# Altium PCB board.PcbDoc
Units mm, origin at the board's own origin, x right, y up, seen from the top; angles counter-clockwise.
Board outline 39.75 x 48.5 mm, 2 copper layers (Top Layer, Bottom Layer), stack 0.97 mm thick; 115 components, 19 nets, 316 pads, 8 vias.
Unrouted connection lines stored in the file: 1.
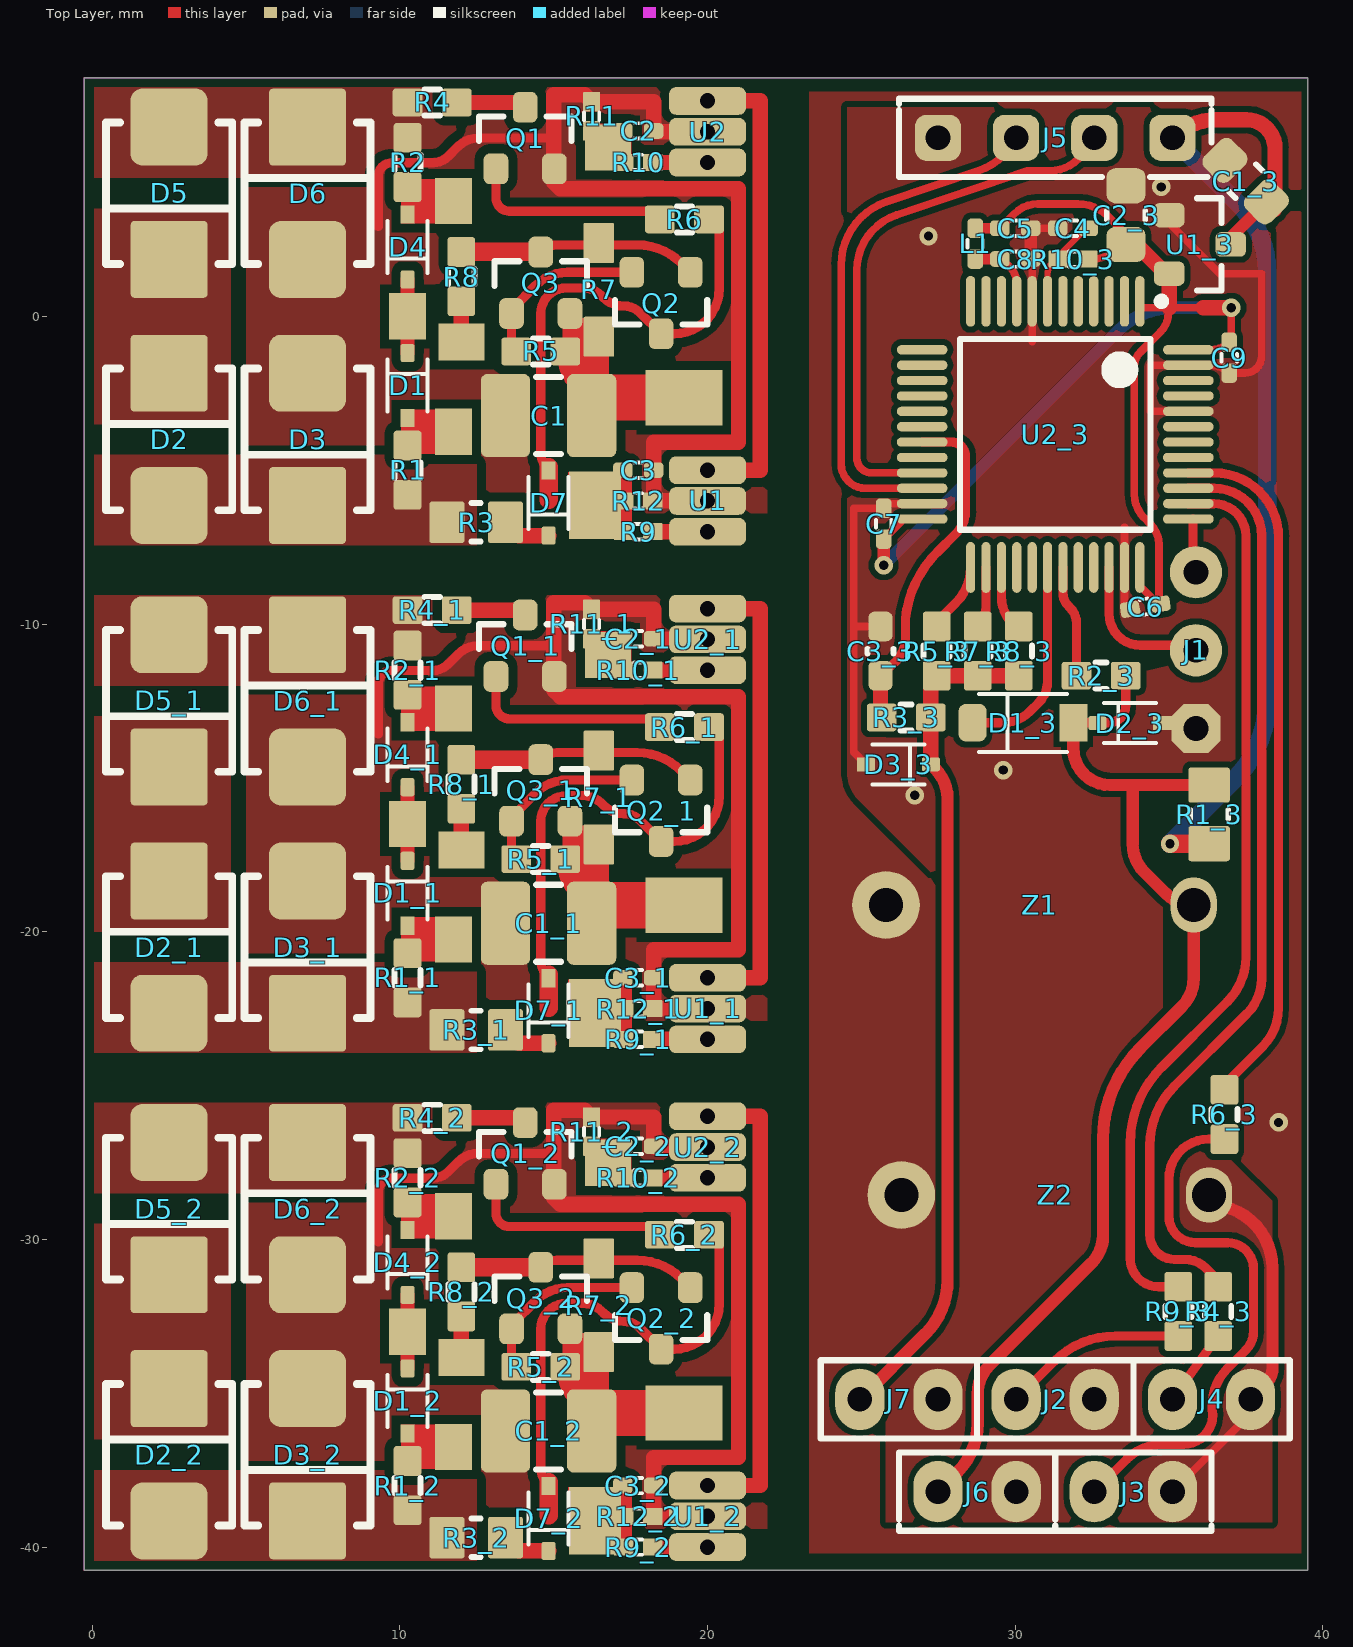
[diagram p0: Top Layer view]
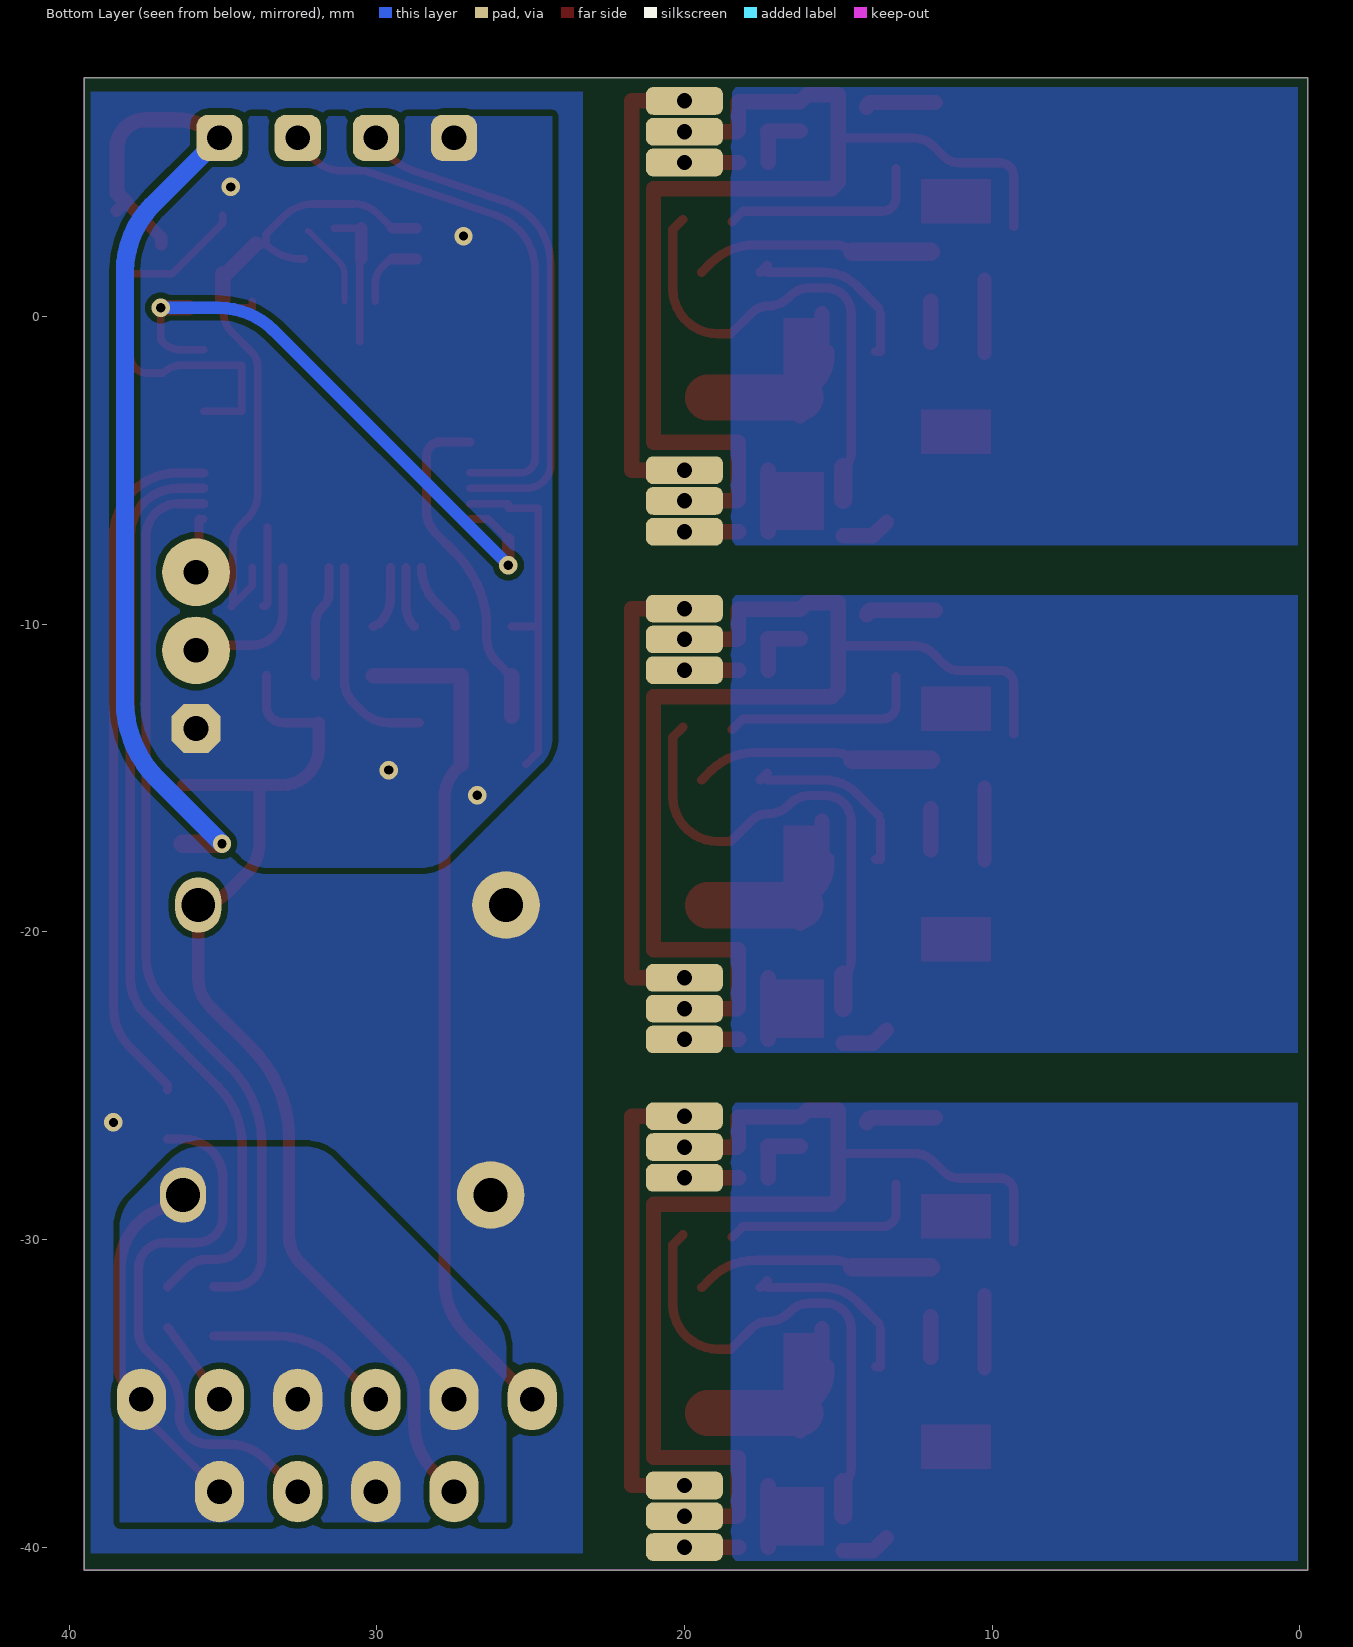
[diagram p1: Bottom Layer view, seen from below]
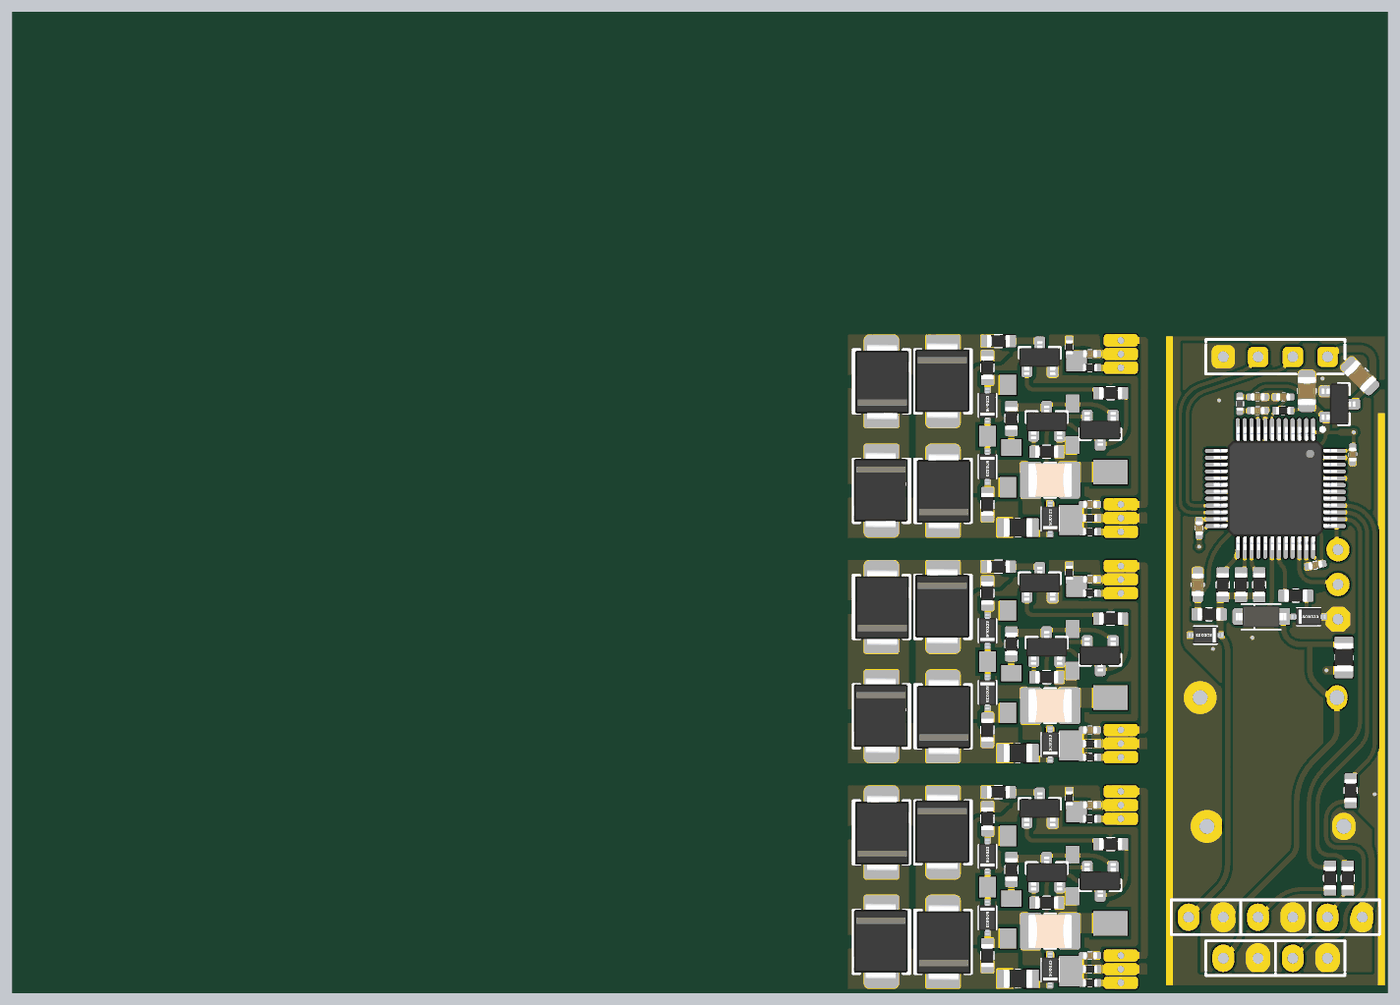
[diagram p2: 3D render of the assembled board from above, using the file's embedded part models]

## Layer stack, top to bottom
Top Solder: solder mask 0.0127, Solder Resist, Dk 3.8
Top Layer: signal copper 0.035
Dielectric: core 0.9, FR-4, Dk 4.5
Bottom Layer: signal copper 0.035
Bottom Solder: solder mask 0.0127, Solder Resist, Dk 3.8

## Board outline
-0.25,-40.75 39.5,-40.75 39.5,7.75 -0.25,7.75

## Design rules (kind name [scope] priority, off if disabled: settings)
AcuteAngle [All] p1: minimum=6.00000000000000E+0001 checktracksonly=FALSE
BoardOutlineClearance [All] p1: gap=0 ignorepadtopadclearanceinfootprint=FALSE
Clearance Clearance_1 [All] p1: gap=0.3 ignorepadtopadclearanceinfootprint=FALSE except(0.1: Arc-THPad Track-THPad SMDPad-THPad THPad-THPad; 0.13: Arc-Arc Arc-Track Arc-SMDPad Arc-Via Track-Track Track-SMDPad Track-Via SMDPad-SMDPad SMDPad-Via THPad-Via Via-Via; 0.15: Arc-Text Arc-Hole Track-Text Track-Hole SMDPad-Text SMDPad-Hole THPad-Text THPad-Hole Via-Text Via-Hole Fill-Text Fill-Hole Poly-Text Poly-Hole Region-Text Region-Hole Text-Text Text-Hole)
ComponentClearance ComponentClearance_1 [IsFree] p1: gap=-1 collisioncheckmode=3 verticalgap=2540 showdistances=FALSE
ComponentClearance [All] p2: gap=0.3 collisioncheckmode=3 verticalgap=0.254 showdistances=FALSE donotcheckwithout3dbody=TRUE
Height [All] p1: minheight=0 maxheight=500 prefheight=12.7
HoleSize [All] p1: absolutevalues=TRUE maxlimit=6 minlimit=0.2 maxpercent=80.000 minpercent=20.000
HoleToHoleClearance HoleToHoleClearance_1 [IsVia vs IsThruPin] p1: gap=0.7 allowstackedmicrovias=TRUE
HoleToHoleClearance [All] p2: gap=0.5 allowstackedmicrovias=TRUE
MinimumSolderMaskSliver [All] p1 off: minsoldermaskwidth=0.254
PlaneClearance [All] p1: clearance=0.45
PlaneConnect [All] p1: planeconnectstyle=Direct reliefexpansion=0.3 reliefentries=4 reliefconductorwidth=0.381 reliefairgap=0.178
PolygonConnect [All] p1: connectstyle=Direct reliefconductorwidth=0.381 reliefentries=4 polygonreliefangle="90 Angle" airgapwidth=0.356
RoutingVias [All] p1: holewidth=0.3 width=0.6 viastyle="Through Hole" minholewidth=0.2 minwidth=0.45 maxholewidth=0.9 maxwidth=1.27
SilkToSilkClearance [All] p1 off: silktosilkclearance=0.254
SilkToSolderMaskClearance [IsPad] p1 off: minsilkscreentomaskgap=0.254 clearancetoexposedcopper=TRUE
SolderMaskExpansion [All] p1: expansion=0.102 istentingtop=FALSE
SupplyNets "Schematic Supply Nets_7" [InNet('L1')] p1: voltage=0.000
SupplyNets "Schematic Supply Nets_6" [InNet('L2')] p2: voltage=0.000
SupplyNets "Schematic Supply Nets_5" [InNet('3V3')] p3: voltage=0.000
SupplyNets "Schematic Supply Nets_3" [InNet('Vb')] p4: voltage=0.000
SupplyNets "Schematic Supply Nets" [InNet('5V')] p5: voltage=0.000
SupplyNets "Schematic Supply Nets_1" [InNet('GND')] p6: voltage=0.000
UnRoutedNet [All] p1: checkbadconnections=TRUE
Width [All] p1: maxlimit=3.81 minlimit=0.14 preferedwidth=0.254
20 further rules are at their usual default settings.

## Classes and differential pairs
component class board: C1 C2 C3 D1 D2 D3 D4 D5 D6 D7 Q1 Q2 Q3 R1 R2 R3 R4 R5 R6 R7 R8 R9 R10 R11 R12 U1 U2

## Components (designator, comment, footprint, x,y, rotation, side; value= is the part's Value field where it differs from the comment)
C1 "10u" C1210-2.5MM 14.834,-3.226 r180 top
C1_1 "10u" C1210-2.5MM 14.834,-19.726 r180 top (schematic designator C1)
C1_2 "10u" C1210-2.5MM 14.834,-36.226 r180 top (schematic designator C1)
C1_3 "10uF" C0805 37.491,4.395 r315 top (schematic designator C1)
C2 "100pF" C0402 17.75,6.024 r0 top
C2_1 "100pF" C0402 17.75,-10.476 r0 top (schematic designator C2)
C2_2 "100pF" C0402 17.75,-26.976 r0 top (schematic designator C2)
C2_3 "10uF" C0805 33.6,3.29 r270 top (schematic designator C2)
C3 "100pF" C0402 17.75,-5 r0 top
C3_1 "100pF" C0402 17.75,-21.5 r0 top (schematic designator C3)
C3_2 "100pF" C0402 17.75,-38 r0 top (schematic designator C3)
C3_3 "100pF" C0603 25.619,-10.878 r270 top (schematic designator C3)
C4 "100nF" C0402 31.877,2.862 r0 top
C5 "100nF" C0402 30,2.862 r180 top
C6 "100nF" C0402 34.226,-9.438 r10 top
C7 "100nF" C0402 25.725,-6.738 r270 top
C8 "100nF" C0402 30,1.862 r180 top
C9 "100nF" C0402 36.952,-1.344 r90 top
D1 "1N4148WS" SOD-323 10.25,-2.25 r270 top
D1_1 "1N4148WS" SOD-323 10.25,-18.75 r270 top (schematic designator D1)
D1_2 "1N4148WS" SOD-323 10.25,-35.25 r270 top (schematic designator D1)
D1_3 "1N4148WS" SOD-123 30.252,-13.206 r0 top (schematic designator D1)
D2 "ES2B" SMB 2.5,-4 r90 top
D2_1 "ES2B" SMB 2.5,-20.5 r90 top (schematic designator D2)
D2_2 "ES2B" SMB 2.5,-37 r90 top (schematic designator D2)
D2_3 "5V" SOD-323 33.726,-13.219 r0 top (schematic designator D2)
D3 "ES2B" SMB 7,-4 r270 top
D3_1 "ES2B" SMB 7,-20.5 r270 top (schematic designator D3)
D3_2 "ES2B" SMB 7,-37 r270 top (schematic designator D3)
D3_3 "5V" SOD-323 26.203,-14.561 r180 top (schematic designator D3)
D4 "1N4148WS" SOD-323 10.25,2.25 r90 top
D4_1 "1N4148WS" SOD-323 10.25,-14.25 r90 top (schematic designator D4)
D4_2 "1N4148WS" SOD-323 10.25,-30.75 r90 top (schematic designator D4)
D5 "ES2B" SMB 2.5,4 r270 top
D5_1 "ES2B" SMB 2.5,-12.5 r270 top (schematic designator D5)
D5_2 "ES2B" SMB 2.5,-29 r270 top (schematic designator D5)
D6 "ES2B" SMB 7,4 r90 top
D6_1 "ES2B" SMB 7,-12.5 r90 top (schematic designator D6)
D6_2 "ES2B" SMB 7,-29 r90 top (schematic designator D6)
D7 "BAS321" SOD-323 14.834,-6.071 r90 top
D7_1 "BAS321" SOD-323 14.834,-22.571 r90 top (schematic designator D7)
D7_2 "BAS321" SOD-323 14.834,-39.071 r90 top (schematic designator D7)
J1 "SWD" SWD 35.874,-10.857 r0 top
J2 "Header 2" HDR-1X2 31.3,-35.2 r90 top
J3 "Header 2" HDR-1X2 33.84,-38.2 r90 top
J4 "Header 2" HDR-1X2 36.38,-35.2 r90 top
J5 "Header 4" HDR-1X4 31.3,5.8 r270 top
J6 "Header 2" HDR-1X2 28.76,-38.2 r90 top
J7 "Header 2" HDR-1X2 26.22,-35.2 r90 top
L1 "BEAD" L0402 28.7,2.362 r270 top
Q1 "MMBT2222" SOT-23 14.073,5.793 r270 top
Q1_1 "MMBT2222" SOT-23 14.073,-10.707 r270 top (schematic designator Q1)
Q1_2 "MMBT2222" SOT-23 14.073,-27.207 r270 top (schematic designator Q1)
Q2 "Bipolar PNP 3 Pins Transistor Gummel-Poon Model" SOT-23 18.491,0.432 r90 top
Q2_1 "Bipolar PNP 3 Pins Transistor Gummel-Poon Model" SOT-23 18.491,-16.068 r90 top (schematic designator Q2)
Q2_2 "Bipolar PNP 3 Pins Transistor Gummel-Poon Model" SOT-23 18.491,-32.568 r90 top (schematic designator Q2)
Q3 "Bipolar PNP 3 Pins Transistor Gummel-Poon Model" SOT-23 14.58,1.092 r270 top
Q3_1 "Bipolar PNP 3 Pins Transistor Gummel-Poon Model" SOT-23 14.58,-15.408 r270 top (schematic designator Q3)
Q3_2 "Bipolar PNP 3 Pins Transistor Gummel-Poon Model" SOT-23 14.58,-31.908 r270 top (schematic designator Q3)
R1 "20k" R0603 10.25,-5 r270 top
R1_1 "20k" R0603 10.25,-21.5 r270 top (schematic designator R1)
R1_2 "20k" R0603 10.25,-38 r270 top (schematic designator R1)
R1_3 "2k2" R0805 36.3,-16.187 r270 top (schematic designator R1)
R2 "20k" R0603 10.25,5 r90 top
R2_1 "20k" R0603 10.25,-11.5 r90 top (schematic designator R2)
R2_2 "20k" R0603 10.25,-28 r90 top (schematic designator R2)
R2_3 "10k" R0603 32.788,-11.678 r0 top (schematic designator R2)
R3 "22" R0805 12.481,-6.694 r0 top
R3_1 "22" R0805 12.481,-23.194 r0 top (schematic designator R3)
R3_2 "22" R0805 12.481,-39.694 r0 top (schematic designator R3)
R3_3 "4k7" R0603 26.458,-13.037 r0 top (schematic designator R3)
R4 "1" R0603 11.05,6.95 r0 top
R4_1 "1" R0603 11.05,-9.55 r0 top (schematic designator R4)
R4_2 "1" R0603 11.05,-26.05 r0 top (schematic designator R4)
R4_3 "470" R0603 36.597,-32.341 r270 top (schematic designator R4)
R5 "33" R0603 14.58,-1.143 r180 top
R5_1 "33" R0603 14.58,-17.643 r180 top (schematic designator R5)
R5_2 "33" R0603 14.58,-34.143 r180 top (schematic designator R5)
R5_3 "10k" R0603 27.448,-10.878 r270 top (schematic designator R5)
R6 "4k7" R0603 19.25,3.15 r180 top
R6_1 "4k7" R0603 19.25,-13.35 r180 top (schematic designator R6)
R6_2 "4k7" R0603 19.25,-29.85 r180 top (schematic designator R6)
R6_3 "470" R0603 36.8,-25.941 r270 top (schematic designator R6)
R7 "10k" R1206 16.468,0.86 r270 top
R7_1 "10k" R1206 16.468,-15.64 r270 top (schematic designator R7)
R7_2 "10k" R1206 16.468,-32.14 r270 top (schematic designator R7)
R7_3 "20k" R0603 28.782,-10.878 r270 top (schematic designator R7)
R8 "4k7" R0603 12,1.292 r270 top
R8_1 "4k7" R0603 12,-15.208 r270 top (schematic designator R8)
R8_2 "4k7" R0603 12,-31.708 r270 top (schematic designator R8)
R8_3 "30k" R0603 30.115,-10.878 r270 top (schematic designator R8)
R9 "1k" R0402 17.75,-7 r180 top
R9_1 "1k" R0402 17.75,-23.5 r180 top (schematic designator R9)
R9_2 "1k" R0402 17.75,-40 r180 top (schematic designator R9)
R9_3 "470" R0603 35.3,-32.341 r270 top (schematic designator R9)
R10 "1k" R0402 17.75,5 r180 top
R10_1 "1k" R0402 17.75,-11.5 r180 top (schematic designator R10)
R10_2 "1k" R0402 17.75,-28 r180 top (schematic designator R10)
R10_3 "4k7" R0402 31.877,1.862 r180 top (schematic designator R10)
R11 "2k" R0402 16.23,6.5 r270 top
R11_1 "2k" R0402 16.23,-10 r270 top (schematic designator R11)
R11_2 "2k" R0402 16.23,-26.5 r270 top (schematic designator R11)
R12 "2k" R0402 17.75,-6 r180 top
R12_1 "2k" R0402 17.75,-22.5 r180 top (schematic designator R12)
R12_2 "2k" R0402 17.75,-39 r180 top (schematic designator R12)
U1 "SS49E" SS49E 20,-6 r0 top
U1_1 "SS49E" SS49E 20,-22.5 r0 top (schematic designator U1)
U1_2 "SS49E" SS49E 20,-39 r0 top (schematic designator U1)
U1_3 "XC6206P332MR" SOT-23 36.004,2.337 r180 top (schematic designator U1)
U2 "SS49E" SS49E 20,6 r0 top
U2_1 "SS49E" SS49E 20,-10.5 r0 top (schematic designator U2)
U2_2 "SS49E" SS49E 20,-27 r0 top (schematic designator U2)
U2_3 "STM32F103CBT6" LQFP-48 31.3,-3.838 r270 top (schematic designator U2)
Z1 "Z" Z90 30.8,-19.133 r90 top
Z2 "Z" Z90 31.3,-28.557 r90 top locked

## Footprints (in the part's own frame and the unit in brackets; to place one, negate y for a bottom-side part, rotate by r counter-clockwise, add the part's x,y. Pads: shape width x height; smd on the part's side, far side on the other; paste and mask are expansions set on the pad)
C0402 [mm] "Chip Capacitor Body"
  rrect50% 0.635x0.508 smd mask+0.05: 1(-0.5,0) 2(0.5,0)
  silkscreen extent -0.13,-0.25 0.13,0.25, body extent -0.52,-0.27 0.53,0.28, height 0.55
C0603 [mil] "Chip Capacitor"
  rrect50% 38x31 smd mask+1.97: 1(-31.5,0) 2(31.5,0)
  silkscreen extent -3,-17 3,17, body extent -33,-18 33,18, height 35
C0805 [mil] "Chip Capacitor"
  rrect50% 45x50 smd mask+1.97: 1(-37.5,0) 2(37.5,0)
  silkscreen extent -6,-25 6,25, body extent -41,-27 41,27, height 53
C1210-2.5MM [mm] "Chip Capacitor"
  rrect25% 1.6x2.7 smd mask+0.05: 1(-1.4,0) 2(1.4,0)
  silkscreen extent -0.4,-1.25 0.4,1.25, body extent -1.6,-1.25 1.6,1.25, height 2.52
HDR-1X2 [mm]
  oval 2x1.6 hole 0.8: 1(0,1.27) 2(0,-1.27)
  silkscreen extent -1.27,-2.54 1.27,2.54
HDR-1X4 [mm]
  rrect50% 1.5x1.5 hole 0.8: 1(0,3.81) 2(0,1.27) 3(0,-1.27) 4(0,-3.81)
  silkscreen extent -1.27,-5.08 1.27,5.08
L0402 [mm] "Chip Inductor"
  rrect50% 0.635x0.508 smd mask+0.05: 1(-0.5,0) 2(0.5,0)
  silkscreen extent -0.13,-0.25 0.13,0.25, body extent -0.5,-0.25 0.5,0.25, height 0.5
LQFP-48 [mm]
  oval 1.65x0.3 smd: 1(-4.325,2.75) 2(-4.325,2.25) 3(-4.325,1.75) 4(-4.325,1.25) 5(-4.325,0.75) 6(-4.325,0.25) 7(-4.325,-0.25) 8(-4.325,-0.75) 9(-4.325,-1.25) 10(-4.325,-1.75) 11(-4.325,-2.25) 12(-4.325,-2.75) 25(4.325,-2.75) 26(4.325,-2.25) 27(4.325,-1.75) 28(4.325,-1.25) 29(4.325,-0.75) 30(4.325,-0.25) 31(4.325,0.25) 32(4.325,0.75) 33(4.325,1.25) 34(4.325,1.75) 35(4.325,2.25) 36(4.325,2.75)
  oval 0.3x1.65 smd: 13(-2.75,-4.325) 14(-2.25,-4.325) 15(-1.75,-4.325) 16(-1.25,-4.325) 17(-0.75,-4.325) 18(-0.25,-4.325) 19(0.25,-4.325) 20(0.75,-4.325) 21(1.25,-4.325) 22(1.75,-4.325) 23(2.25,-4.325) 24(2.75,-4.325) 37(2.75,4.325) 38(2.25,4.325) 39(1.75,4.325) 40(1.25,4.325) 41(0.75,4.325) 42(0.25,4.325) 43(-0.25,4.325) 44(-0.75,4.325) 45(-1.25,4.325) 46(-1.75,4.325) 47(-2.25,4.325) 48(-2.75,4.325)
  silkscreen extent -4.45,-3.1 3.1,3.58, body extent -4.5,-4.5 4.5,4.5, height 1.5
R0402 [mm]
  rrect10% 0.635x0.55 smd mask+0.05: 1(-0.476,0) 2(0.476,0)
  silkscreen extent -0.12,-0.25 0.13,0.25, body extent -0.52,-0.27 0.53,0.28, height 0.4
R0603 [mil] "Chip Resistor; Body 1.6 x 0.8 mm (LxW typ)"
  rrect20% 38x35.43 smd mask+1.97: 1(-31.5,0) 2(31.5,0)
  silkscreen extent -10,-17 10,17, body extent -33,-18 33,18, height 22
R0805 [mil] "Chip Resistor; Body 1.6 x 0.8 mm (LxW typ)"
  rrect15% 45x53.15 smd: 1(-37.5,0) 2(37.5,0)
  silkscreen extent -6,-25 6,25, body extent -41,-27 41,27, height 24
R1206 [mm] "Chip Resistor"
  rrect10% 1.3x1 smd mask+0.05: 1(-1.524,0) 2(1.524,0)
SMB [mm]
  rrect30% 2.5x2.5 smd mask+0.05: 1(-2.15,0)
  rrect10% 2.5x2.5 smd mask+0.05: 2(2.15,0)
  silkscreen extent -2.3,-2.05 2.3,2.05, body extent -2.75,-1.93 2.85,2.02, height 2.65
SOD-123 [mm]
  rect 0.91x1.22 smd mask+0.05: 1(1.635,0)
  rrect50% 0.91x1.22 smd mask+0.05: 2(-1.635,0)
  silkscreen extent -1.43,-0.95 1.43,0.92, body extent -1.85,-0.77 1.85,0.77, height 1.44
SOD-323 [mm]
  rect 0.59x0.45 smd mask+0.05: 1(1.055,0)
  rrect30% 0.59x0.45 smd mask+0.05: 2(-1.055,0)
  silkscreen extent -0.85,-0.65 0.85,0.65, body extent -1.25,-0.63 1.25,0.62, height 0.99
SOT-23 [mm]
  rrect50% 1x0.8 smd mask+0.05: 1(1,-0.95) 2(1,0.95) 3(-1,0)
  silkscreen extent -0.7,-1.5 0.1,1.5, body extent -1.27,-1.5 1.33,1.5, height 1.1
SS49E [mm]
  rrect50% 2.5x0.9 hole 0.5: 1(0,1) 2(0,0) 3(0,-1)
SWD [mm]
  round 1.7 / inner round 1.7 / far side round 2.2 hole 0.8: 1(0,2.54) 2(0,0)
  oct 1.6x1.6 hole 0.8: 3(0,-2.54)
Z90 [mm]
  round 2.2 hole 1.1: 1(0,5)
  oval 1.8x1.5 hole 1.1: 2(0,-5)
  body extent -4.5,-3 4.5,3, height 9.5

## Part data
C1 C1_1 C1_2 C2 C2_1 C2_2 C3 C3_1 C3_2: library part CAP
C1_3 C2_3 C3_3: library part CAP, "10uf 50V 1206"
C4 C5 C6 C7 C8 C9: library part CAP, "100nF 50V 0402"
D1 D1_1 D1_2 D2 D2_1 D2_2 D3 D3_1 D3_2 D4 D4_1 D4_2 D5 D5_1 D5_2 D6 D6_1 D6_2 D7 D7_1 D7_2: library part NCP51460SN33T1G
D1_3: library part NCP51460SN33T1G, LCSC part number=C693617, P/N=SMCJ24A
D2_3 D3_3: library part NCP51460SN33T1G, "SD05", LCSC part number=C693617, P/N=SMCJ24A
J1: library part "Header 3"
L1: library part BLM18AG601SN1D, "BEAD 0402"
Q1 Q1_1 Q1_2: library part MMBT2222ALT1G
Q2 Q2_1 Q2_2 Q3 Q3_1 Q3_2: library part "BJT PNP GP"
R1 R1_1 R1_2 R1_3 R2 R2_1 R2_2 R2_3 R3 R3_1 R3_2 R3_3 R4 R4_1 R4_2 R4_3 R5 R5_1 R5_2 R5_3 R6 R6_1 R6_2 R6_3 R7 R7_1 R7_2 R7_3 R8 R8_1 R8_2 R8_3 R9 R9_1 R9_2 R9_3 R10 R10_1 R10_2 R11 R11_1 R11_2 R12 R12_1 R12_2: library part RES
R10_3: library part RES, "4k7 0402"
U1_3: library part Component_4_1

## Free pads (board coordinates)
  rect 1.2x1.5 smd: 3.3(10.25,-33) 3.3(10.25,-16.5) 3.3(10.25,0) DCC1(11.75,-36.75) DCC1(11.75,-20.25) DCC1(11.75,-3.75) DCC2(11.75,-29.25) DCC2(11.75,-12.75) DCC2(11.75,3.75)
  rect 2.5x1.8 smd: 5(19.231,-35.642) 5(19.231,-19.142) 5(19.231,-2.642)
  rect 1.5x1.2 smd: +(12,-33.838) +(12,-17.338) +(12,-0.838)
  rect 1.7x2.2 smd: H1(16.341,-39.142) H1(16.341,-22.642) H1(16.341,-6.142)
  rect 1.5x1.5 smd: H2(16.764,-27.511) H2(16.764,-11.011) H2(16.764,5.489)

## Via types
v1: diameter 0.6, hole 0.3, Top Layer to Bottom Layer, tented both sides, 8 vias

## Nets (pads, with @x,y where several pads share a name; then routed paths per layer and width w, separated by ;. In a path a pad name is that pad's centre, name@x,y a point inside that pad or via, vN(x,y) a via of type N, cw(c..) or ccw(c..) an arc to the next point about the centre after c; other vN are vias at no path point)
3V3: D1.2 D4.2 pad.3.3@10.25,0 | length 2.4
  Top Layer w0.45: D1.2 10.25,0 D4.2
5V: C1.1 pad.5@19.231,-2.642 Q3.2 R5.1 R7.2 U1.1 U2.1 | length 22.2
  Top Layer w0.5: Q3.2 15.53,-0.774 15.53,-1.143 R5.1 15.38,-1.359 ccw(c16.483,-1.359) 15.703,-2.139 C1.1@16.234,-2.67 ; C1.1 C1.1@16.234,-2.642 ; U1.1 21.717,-5 21.717,7 U2.1
  Top Layer w1.5: C1.1@16.234,-2.642 pad.5@19.231,-2.642
DCC1: D1.1 pad.DCC1@11.75,-3.75 R1.1
DCC2: D4.1 pad.DCC2@11.75,3.75 R2.1
GND: C1.2 C2.2 C3.2 D3.1 D6.1 Q1.2 R11.1 R12.1 U1.2 U2.2 | length 37.4
  Top Layer w0.3: 9.296,2.921 9.296,4.547 cw(c9.74,4.547) 9.74,4.99 11.078,4.99 ccw(c11.078,5.684) 11.569,5.193 11.902,5.527 cw(c12.546,4.882) 12.546,5.793 15.037,5.793
  Top Layer w0.5: R12.1@18.25,-5.976 C3.2 18.25,-4.089 21.006,-4.089 21.006,4.14 15.215,4.14 14.996,4.359 14.996,4.793 14.996,5.793 14.996,7.196 16.01,7.196 R11.1 18.25,6.976 C2.2 ; R12.1@18.283,-6 U1.2 ; C2.2@18.283,6 U2.2
HALL1: C3.1 pad.H1@16.341,-6.142 R9.2 R12.2 | length 2
  Top Layer w0.5: R9.2 R12.2 C3.1@17.274,-5
HALL2: C2.1 pad.H2@16.764,5.489 R10.2 R11.2 | length 2.1
  Top Layer w0.5: R11.2 pad.H2@17.298,6.024 ; R10.2 pad.H2@17.274,6
L1: D2.1 D3.2 R1.2 R3.1
L2: D5.1 D6.2 R2.2 R4.1
NetD7_1: D7.1 Q2.3 R6.1 | length 16.2
  Top Layer w0.3: D7.1 cw(c15.447,-4.402) 14.58,-4.402 14.58,0.087 cw(c15.415,0.087) 15.415,0.922 15.948,0.922 cw(c15.948,0.07) 16.55,0.672 16.609,0.614 ccw(c17.286,1.29) 17.286,0.333 cw(c17.286,-0.4) 17.805,0.118 Q2.3 18.908,-0.568 ccw(c18.908,0.904) 20.38,0.904 20.38,2.819 R6.1
  Top Layer w0.6: 14.834,-5.969 D7.1@14.834,-4.9
NetD7_2: D7.2 R3.2 | length 1.6
  Top Layer w0.5: R3.2 13.865,-7.126 D7.2
NetQ1_1: Q1.1 R6.2 | length 6.7
  Top Layer w0.3: Q1.1 13.123,3.857 ccw(c13.566,3.857) 13.566,3.414 18.109,3.414 R6.2@18.45,3.073
NetQ1_3: Q1.3 R4.2 | length 2.3
  Top Layer w0.5: R4.2 13.917,6.95 cw(c13.917,6.793) Q1.3
NetQ2_1: Q2.1 Q3.3 R7.1 R8.1 | length 7.8
  Top Layer w0.3: Q3.3@14.545,2.092 cw(c15.097,1.54) 15.097,2.321 17.717,2.321 cw(c17.717,0.305) 19.143,1.73 Q2.1
  Top Layer w0.6: R8.1 Q3.3@14.545,2.092
NetQ2_2: Q2.2 Q3.1 R5.2 | length 5.8
  Top Layer w0.3: Q3.1 13.63,-1.143 R5.2 ; Q3.1@13.68,0.27 14.409,0.999 cw(c15.454,-0.046) 15.454,1.432 ; 15.438,1.432 Q2.2@17.313,1.432 ; Q2.2@17.313,1.66 Q2.2
NetR9_1: R9.1 U1.3 | length 1.8
  Top Layer w0.5: R9.1 U1.3
NetR10_1: R10.1 U2.3 | length 1.8
  Top Layer w0.5: R10.1 U2.3
UART_OD: pad.+@12,-0.838 R8.2 | length 1.3
  Top Layer w0.5: pad.+@12,-0.838 R8.2
Vb: D2.2 D5.2
pads on no net: C1_1.1 C1_1.2 C1_2.1 C1_2.2 C1_3.1 C1_3.2 C2_1.1 C2_1.2 C2_2.1 C2_2.2 C2_3.1 C2_3.2 C3_1.1 C3_1.2 C3_2.1 C3_2.2 C3_3.1 C3_3.2 C4.1 C4.2 C5.1 C5.2 C6.1 C6.2 C7.1 C7.2 C8.1 C8.2 C9.1 C9.2 D1_1.1 D1_1.2 D1_2.1 D1_2.2 D1_3.1 D1_3.2 D2_1.1 D2_1.2 D2_2.1 D2_2.2 D2_3.1 D2_3.2 D3_1.1 D3_1.2 D3_2.1 D3_2.2 D3_3.1 D3_3.2 D4_1.1 D4_1.2 D4_2.1 D4_2.2 D5_1.1 D5_1.2 D5_2.1 D5_2.2 D6_1.1 D6_1.2 D6_2.1 D6_2.2 D7_1.1 D7_1.2 D7_2.1 D7_2.2 J1.1 J1.2 J1.3 J2.1 J2.2 J3.1 J3.2 J4.1 J4.2 J5.1 J5.2 J5.3 J5.4 J6.1 J6.2 J7.1 J7.2 L1.1 L1.2 Q1_1.1 Q1_1.2 Q1_1.3 Q1_2.1 Q1_2.2 Q1_2.3 Q2_1.1 Q2_1.2 Q2_1.3 Q2_2.1 Q2_2.2 Q2_2.3 Q3_1.1 Q3_1.2 Q3_1.3 Q3_2.1 Q3_2.2 Q3_2.3 R1_1.1 R1_1.2 R1_2.1 R1_2.2 R1_3.1 R1_3.2 R2_1.1 R2_1.2 R2_2.1 R2_2.2 R2_3.1 R2_3.2 R3_1.1 R3_1.2 R3_2.1 R3_2.2 R3_3.1 R3_3.2 R4_1.1 R4_1.2 R4_2.1 R4_2.2 R4_3.1 R4_3.2 R5_1.1 R5_1.2 R5_2.1 R5_2.2 R5_3.1 R5_3.2 R6_1.1 R6_1.2 R6_2.1 R6_2.2 R6_3.1 R6_3.2 R7_1.1 R7_1.2 R7_2.1 R7_2.2 R7_3.1 R7_3.2 R8_1.1 R8_1.2 R8_2.1 R8_2.2 R8_3.1 R8_3.2 R9_1.1 R9_1.2 R9_2.1 R9_2.2 R9_3.1 R9_3.2 R10_1.1 R10_1.2 R10_2.1 R10_2.2 R10_3.1 R10_3.2 R11_1.1 R11_1.2 R11_2.1 R11_2.2 R12_1.1 R12_1.2 R12_2.1 R12_2.2 U1_1.1 U1_1.2 U1_1.3 U1_2.1 U1_2.2 U1_2.3 U1_3.1 U1_3.2 U1_3.3 U2_1.1 U2_1.2 U2_1.3 U2_2.1 U2_2.2 U2_2.3 U2_3.1 U2_3.2 U2_3.3 U2_3.4 U2_3.5 U2_3.6 U2_3.7 U2_3.8 U2_3.9 U2_3.10 U2_3.11 U2_3.12 U2_3.13 U2_3.14 U2_3.15 U2_3.16 U2_3.17 U2_3.18 U2_3.19 U2_3.20 U2_3.21 U2_3.22 U2_3.23 U2_3.24 U2_3.25 U2_3.26 U2_3.27 U2_3.28 U2_3.29 U2_3.30 U2_3.31 U2_3.32 U2_3.33 U2_3.34 U2_3.35 U2_3.36 U2_3.37 U2_3.38 U2_3.39 U2_3.40 U2_3.41 U2_3.42 U2_3.43 U2_3.44 U2_3.45 U2_3.46 U2_3.47 U2_3.48 Z1.1 Z1.2 Z2.1 Z2.2
copper on no net: | length 593.7
  Top Layer w0.2: 31.05,0.487 31.05,1.369 cw(c31.6,1.369) 31.211,1.757 32.232,2.777
  Top Layer w0.25: 25.148,-14.561 24.748,-14.161 24.748,-10.078 ; 25.619,-10.078 24.748,-10.078 ; 25.725,-7.238 26.375,-6.588 26.975,-6.588 ; 25.725,-6.088 25.725,-6.138 ; 25.846,-6.088 ccw(c25.846,-6.259) 25.725,-6.138 ; 25.875,-6.088 26.975,-6.088 ; 26.975,-5.588 25.129,-5.588 cw(c25.129,-4.802) 24.344,-4.802 24.344,1.67 cw(c26.509,1.67) 25.817,3.722 28.807,4.731 ccw(c28.128,6.742) 30.03,5.8 ; 26.975,-5.088 25.335,-5.088 cw(c25.335,-4.606) 24.853,-4.606 24.853,1.501 cw(c26.742,1.501) 26.138,3.291 30.402,4.73 31.127,4.73 ccw(c31.127,6.025) 32.043,5.109 32.409,5.476 ; 29.5,1.862 29.566,1.862 29.825,1.602 cw(c29.282,1.059) 30.05,1.059 30.05,0.487 ; 29.5,2.862 29.972,3.334 cw(c30.743,2.563) 30.743,3.653 32.03,3.653 cw(c32.03,2.238) 33.031,3.239 33.6,2.669 33.6,2.337 ; 30.5,1.862 30.55,1.862 30.55,0.487 30.55,-0.822 ; 30.5,2.862 31.377,2.862 ; 32.353,1.862 32.453,1.862 ccw(c32.453,3.484) 33.6,2.337 ; 33.55,-9.292 ccw(c33.721,-9.292) 33.6,-9.413 33.7,-9.413 ; 33.55,-9.263 33.55,-6.854 ; 34.05,-8.163 34.05,-8.763 34.7,-9.413 ; 34.05,0.487 34.05,0.275 34.978,0.275 ; 34.054,2.337 33.934,2.337 33.6,2.337 ; 34.726,-9.438 cw(c34.859,-9.306) 34.671,-9.306 34.671,-7.417 ccw(c33.735,-7.417) 34.397,-6.756 34.19,-6.549 cw(c34.964,-5.776) 33.87,-5.776 33.87,-1.624 cw(c34.504,-1.624) 34.056,-1.175 34.712,-0.519 ccw(c34.068,0.124) 34.978,0.124 34.978,0.275 ; 35.004,3.287 35.004,3.028 36.645,1.387 38.011,1.387 38.011,-1.295 cw(c37.461,-1.295) 37.461,-1.844 36.952,-1.844 ccw(c36.333,-2.463) 36.333,-1.588 35.625,-1.588 34.389,-1.588 34.389,-3.088 35.625,-3.088 ; 35.11,-38.2 37.325,-35.985 ccw(c36.539,-35.2) 37.65,-35.2 ; 35.625,-6.588 35.78,-6.588 ; 35.625,-1.088 36.363,-1.088 ccw(c36.363,-0.256) 36.952,-0.844 ccw(c36.782,-0.674) 37.022,-0.674 v1(37.022,0.275) ; 36.116,0.275 35.004,0.275 34.978,0.275 ; 24.748,-10.078 24.748,-6.238 25.725,-6.238 25.725,-6.138
  Top Layer w0.3: 9.296,-30.079 9.296,-28.453 cw(c9.74,-28.453) 9.74,-28.01 11.078,-28.01 ccw(c11.078,-27.316) 11.569,-27.807 11.902,-27.473 cw(c12.546,-28.118) 12.546,-27.207 15.037,-27.207 ; 9.296,-13.579 9.296,-11.953 cw(c9.74,-11.953) 9.74,-11.51 11.078,-11.51 ccw(c11.078,-10.816) 11.569,-11.307 11.902,-10.973 cw(c12.546,-11.618) 12.546,-10.707 15.037,-10.707 ; 13.123,-28.207 13.123,-29.143 ccw(c13.566,-29.143) 13.566,-29.586 18.109,-29.586 18.45,-29.927 ; 13.123,-11.707 13.123,-12.643 ccw(c13.566,-12.643) 13.566,-13.086 18.109,-13.086 18.45,-13.427 ; 13.63,-32.908 13.63,-34.143 13.78,-34.143 ; 13.63,-16.408 13.63,-17.643 13.78,-17.643 ; 13.68,-32.73 14.409,-32.001 cw(c15.454,-33.046) 15.454,-31.568 ; 13.68,-16.23 14.409,-15.501 cw(c15.454,-16.546) 15.454,-15.068 ; 14.545,-30.908 cw(c15.097,-31.46) 15.097,-30.679 17.717,-30.679 cw(c17.717,-32.695) 19.143,-31.27 19.441,-31.568 ; 14.545,-14.408 cw(c15.097,-14.96) 15.097,-14.179 17.717,-14.179 cw(c17.717,-16.195) 19.143,-14.77 19.441,-15.068 ; 14.834,-38.016 cw(c15.447,-37.402) 14.58,-37.402 14.58,-32.913 cw(c15.415,-32.913) 15.415,-32.078 15.948,-32.078 cw(c15.948,-32.93) 16.55,-32.328 16.609,-32.386 ccw(c17.286,-31.71) 17.286,-32.667 cw(c17.286,-33.4) 17.805,-32.882 18.491,-33.568 18.908,-33.568 ccw(c18.908,-32.096) 20.38,-32.096 20.38,-30.181 20.05,-29.85 ; 14.834,-21.516 cw(c15.447,-20.902) 14.58,-20.902 14.58,-16.413 cw(c15.415,-16.413) 15.415,-15.578 15.948,-15.578 cw(c15.948,-16.43) 16.55,-15.828 16.609,-15.886 ccw(c17.286,-15.21) 17.286,-16.167 cw(c17.286,-16.9) 17.805,-16.382 18.491,-17.068 18.908,-17.068 ccw(c18.908,-15.596) 20.38,-15.596 20.38,-13.681 20.05,-13.35 ; 15.438,-31.568 17.313,-31.568 ; 15.438,-15.068 17.313,-15.068 ; 17.313,-31.34 17.541,-31.568 ; 17.313,-14.84 17.541,-15.068 ; 25.619,-12.999 25.658,-13.037 ; 25.619,-11.679 25.658,-11.679 26.104,-11.232 ccw(c25.314,-10.442) 26.432,-10.442 26.432,-9.831 cw(c29.978,-10.197) 27.457,-7.676 28.088,-7.046 ccw(c27.364,-6.322) 28.387,-6.322 28.387,-4.556 ccw(c27.919,-4.556) 27.919,-4.088 26.975,-4.088 ; 27.448,-10.078 cw(c27.798,-10.078) 27.551,-9.831 ; 27.551,-9.831 28.078,-9.303 ccw(c26.938,-8.163) 28.55,-8.163 ; 28.617,-13.206 29.582,-13.206 ccw(c29.582,-11.919) 30.492,-12.829 30.76,-12.562 ccw(c30.058,-11.86) 31.05,-11.86 31.05,-8.163 ; 28.782,-10.078 ccw(c28.133,-9.43) 29.05,-9.43 29.05,-8.163 ; 29.55,-8.163 29.55,-9.106 ccw(c30.811,-9.106) 29.92,-9.997 30.115,-10.078 ; 30.03,-35.2 31.269,-33.961 cw(c33.248,-35.94) 33.248,-33.141 35.3,-33.141 ; 31.55,-8.163 31.55,-8.983 ccw(c32.163,-8.983) 31.73,-9.416 31.784,-9.47 cw(c31.29,-9.964) 31.988,-9.964 31.988,-11.678 ; 31.887,-13.206 33.05,-13.206 ccw(c33.05,-12.668) 33.588,-12.668 33.588,-11.678 ; 32.57,-38.2 33.628,-37.142 cw(c34.794,-38.308) 34.794,-36.659 35.466,-36.659 ccw(c35.466,-35.706) 36.419,-35.706 cw(c38.128,-35.415) 36.902,-34.189 37.492,-33.599 ccw(c36.874,-32.982) 37.747,-32.982 37.747,-30.957 ccw(c36.897,-30.957) 36.897,-30.106 35.855,-30.106 cw(c35.855,-29.244) 34.994,-29.244 34.994,-28.036 cw(c36.289,-28.036) 36.289,-26.741 36.8,-26.741 ; 33.05,-8.163 33.05,-9.672 ccw(c34.067,-9.672) 34.067,-10.689 35.706,-10.689 35.874,-10.857 ; 35.11,-35.2 36.8,-32.862 ; 35.3,-31.541 34.661,-31.541 cw(c34.661,-30.618) 33.738,-30.618 33.738,-26.868 cw(c37.213,-26.868) 34.756,-24.412 36.894,-22.273 ccw(c35.438,-20.817) 37.498,-20.817 37.498,-7.135 ccw(c36.45,-7.135) 36.45,-6.088 35.625,-6.088 ; 35.625,-5.588 36.463,-5.588 cw(c36.463,-7.135) 38.011,-7.135 38.011,-21.514 cw(c36.389,-21.514) 37.535,-22.661 35.171,-25.026 ccw(c37.096,-26.951) 34.373,-26.951 34.373,-29.846 ccw(c35.179,-29.846) 35.179,-30.652 35.515,-30.652 cw(c35.515,-31.606) 36.19,-30.931 36.8,-31.541 ; 35.625,-5.088 36.466,-5.088 cw(c36.466,-7.181) 38.559,-7.181 38.559,-22.481 cw(c36.792,-22.481) 38.041,-23.73 36.8,-24.971 36.8,-25.141 ; 35.78,-7.965 35.78,-6.588
  Top Layer w0.35: 28.701,1.862 29.5,1.862 ; 28.7,2.862 29.5,2.862
  Top Layer w0.4: 24.95,-35.2 27.087,-33.063 ccw(c25.369,-31.345) 27.798,-31.345 27.798,-15.664 ccw(c26.441,-15.664) 27.401,-14.705 27.258,-14.561 ; v1(25.725,-8.087) 25.725,-7.238 ; 27.49,-38.2 28.117,-37.573 ccw(c26.517,-35.973) 28.78,-35.973 28.78,-35.015 cw(c30.099,-35.015) 29.166,-34.083 32.482,-30.768 ccw(c31.582,-29.868) 32.854,-29.868 32.854,-26.726 cw(c37.039,-26.726) 34.08,-23.766 35.421,-22.426 ccw(c34.505,-21.51) 35.8,-21.51 35.8,-19.133 cw(c35.8,-17.846) 34.89,-18.756 34.194,-18.061 cw(c35.11,-17.145) 33.815,-17.145 33.815,-15.234 ; 30.5,1.862 30.5,2.862 ; 31.887,-13.206 31.887,-14.035 ccw(c33.086,-14.035) 33.086,-15.234 33.815,-15.234 ; 36.3,-28.557 36.3,-28.876 cw(c36.3,-30.935) 38.359,-30.935 38.359,-34.173 cw(c37.592,-34.173) 38.134,-34.716 37.65,-35.2 ; 36.3,-15.234 33.815,-15.234 ; 37.004,2.337 37.004,2.561 38.164,3.721 38.452,3.434
  Top Layer w0.45: 10.25,-34.195 10.25,-33 10.25,-31.805 ; 10.25,-17.695 10.25,-16.5 10.25,-15.305
  Top Layer w0.5: 11.85,-26.05 13.917,-26.05 cw(c13.917,-26.207) 14.073,-26.207 ; 11.85,-9.55 13.917,-9.55 cw(c13.917,-9.707) 14.073,-9.707 ; 12,-33.838 12,-32.508 ; 12,-17.338 12,-16.008 ; 13.434,-39.694 13.865,-40.126 14.834,-40.126 ; 13.434,-23.194 13.865,-23.626 14.834,-23.626 ; 15.53,-32.908 15.53,-33.774 15.53,-34.143 15.38,-34.143 15.38,-34.359 ccw(c16.483,-34.359) 15.703,-35.139 16.234,-35.67 ; 15.53,-16.408 15.53,-17.274 15.53,-17.643 15.38,-17.643 15.38,-17.859 ccw(c16.483,-17.859) 15.703,-18.639 16.234,-19.17 ; 16.231,-26.976 17.298,-26.976 ; 16.231,-10.476 17.298,-10.476 ; 16.234,-36.226 16.234,-35.642 ; 16.234,-19.726 16.234,-19.142 ; 17.274,-40 17.274,-39 17.274,-38 ; 17.274,-28 17.274,-27 ; 17.274,-23.5 17.274,-22.5 17.274,-21.5 ; 17.274,-11.5 17.274,-10.5 ; 18.226,-40 20,-40 ; 18.226,-28 20,-28 ; 18.226,-23.5 20,-23.5 ; 18.226,-11.5 20,-11.5 ; 18.25,-38.976 18.25,-38 18.25,-37.089 21.006,-37.089 21.006,-28.86 15.215,-28.86 14.996,-28.641 14.996,-28.207 14.996,-27.207 14.996,-25.804 16.01,-25.804 16.231,-26.024 18.25,-26.024 18.25,-26.976 ; 18.25,-22.476 18.25,-21.5 18.25,-20.589 21.006,-20.589 21.006,-12.36 15.215,-12.36 14.996,-12.141 14.996,-11.707 14.996,-10.707 14.996,-9.304 16.01,-9.304 16.231,-9.524 18.25,-9.524 18.25,-10.476 ; 18.283,-39 20,-39 ; 18.283,-27 20,-27 ; 18.283,-22.5 20,-22.5 ; 18.283,-10.5 20,-10.5 ; 20,-38 21.717,-38 21.717,-26 20,-26 ; 20,-21.5 21.717,-21.5 21.717,-9.5 20,-9.5 ; 25.619,-12.999 25.619,-11.679 ; 27.258,-14.561 27.258,-13.037 27.258,-11.678 27.448,-11.678 28.782,-11.678 30.115,-11.678 ; 33.934,2.337 34.884,1.387 35.004,1.387 35.004,0.275 ; 35.11,5.8 cw(c36.543,4.367) 36.543,6.394 37.507,6.394 cw(c37.507,5.457) 38.444,5.457 38.444,4 38.164,3.721 ; 36.116,0.275 v1(37.022,0.275)
  Top Layer w0.6: 12,-30.908 14.545,-30.908 ; 12,-14.408 14.545,-14.408 ; 14.834,-38.969 14.834,-37.9 ; 14.834,-22.469 14.834,-21.4 ; v1(35.03,-17.139) 36.3,-17.139
  Top Layer w1.5: 16.234,-35.642 19.231,-35.642 ; 16.234,-19.142 19.231,-19.142
  Bottom Layer w0.4: v1(25.725,-8.087) 33.343,-0.469 cw(c35.139,-2.265) 35.139,0.275 v1(37.022,0.275)
  Bottom Layer w0.6: v1(35.03,-17.139) 37.141,-15.028 ccw(c34.625,-12.512) 38.183,-12.512 38.183,1.46 ccw(c35.126,1.46) 37.288,3.622 35.11,5.8
  other v1: 38.559,-26.2 26.732,-15.564 29.612,-14.749 27.181,2.609 34.746,4.207

## Polygon pours and split planes (outlines as drawn)
no net on Top Layer "NONET_L01_P049" (solid, remove dead copper, pour order 49): 23.3,-40.2 39.3,-40.2 39.3,7.3 23.3,7.3
no net on Top Layer "NONET_L01_P048" (solid, remove dead copper, pour order 48): 27.8,-19.152 ccw(c26.505,-19.152) 27.421,-18.236 24.912,-15.727 cw(c25.828,-14.811) 24.533,-14.811 24.533,6.8 38.3,6.8 38.3,-13.163 cw(c37.005,-13.163) 37.921,-14.079 35.179,-16.821 ccw(c36.095,-17.737) 34.8,-17.737 34.8,-24.663 ccw(c36.095,-24.663) 35.179,-25.579 38.346,-28.746 38.346,-39.2 25.8,-39.2 25.8,-35.237 cw(c27.095,-35.237) 26.179,-34.321 27.421,-33.079 ccw(c26.505,-32.163) 27.8,-32.163
no net on Top Layer "NONET_L01_P028" (solid, remove dead copper, pour order 28): 5,-25.5 5,-39.401 22,-39.401 22,-25.5
no net on Top Layer "NONET_L01_P027" (solid, remove dead copper, pour order 27): 10.308,-28.5 ccw(c10.308,-26.085) 12.015,-27.793 12.114,-27.694 cw(c13.451,-29.031) 13.451,-27.14 14.02,-27.14 ccw(c14.02,-26.487) 14.673,-26.487 14.673,-25.5 0,-25.5 0,-28.5
no net on Top Layer "NONET_L01_P026" (solid, remove dead copper, pour order 26): 0,-37.5 12.5,-37.5 12.5,-40.5 0,-40.5
no net on Top Layer "NONET_L01_P025" (solid, remove dead copper, pour order 25): 0,-29.5 4.5,-29.5 4.5,-36.5 0,-36.5
no net on Top Layer "NONET_L01_P023" (solid, remove dead copper, pour order 23): 5,-9 5,-22.901 22,-22.901 22,-9
no net on Top Layer "NONET_L01_P022" (solid, remove dead copper, pour order 22): 10.308,-12 ccw(c10.308,-9.585) 12.015,-11.293 12.114,-11.194 cw(c13.451,-12.531) 13.451,-10.64 14.02,-10.64 ccw(c14.02,-9.987) 14.673,-9.987 14.673,-9 0,-9 0,-12
no net on Top Layer "NONET_L01_P021" (solid, remove dead copper, pour order 21): 0,-21 12.5,-21 12.5,-24 0,-24
no net on Top Layer "NONET_L01_P020" (solid, remove dead copper, pour order 20): 0,-13 4.5,-13 4.5,-20 0,-20
GND on Top Layer "GND_L01_P003" (solid, remove dead copper, pour order 3): 5,7.5 5,-6.401 22,-6.401 22,7.5
L2 on Top Layer "L2_L01_P002" (solid, remove dead copper, pour order 2): 10.308,4.5 ccw(c10.308,6.915) 12.015,5.207 12.114,5.306 cw(c13.451,3.969) 13.451,5.86 14.02,5.86 ccw(c14.02,6.513) 14.673,6.513 14.673,7.5 0,7.5 0,4.5
L1 on Top Layer "L1_L01_P001" (solid, remove dead copper, pour order 1): 0,-4.5 12.5,-4.5 12.5,-7.5 0,-7.5
Vb on Top Layer "VB_L01_P000" (solid, remove dead copper, pour order 0): 0,3.5 4.5,3.5 4.5,-3.5 0,-3.5
no net on Bottom Layer "NONET_L02_P047" (solid, remove dead copper, pour order 47): 23.3,-40.2 39.3,-40.2 39.3,7.3 23.3,7.3
no net on Bottom Layer "NONET_L02_P046" (solid, remove dead copper, pour order 46): 24.679,-14.579 cw(c25.595,-13.663) 24.3,-13.663 24.3,6.51 38.3,6.51 38.3,-13.163 cw(c37.005,-13.163) 37.921,-14.079 36.55,-15.45 34.461,-17.539 cw(c33.545,-16.623) 33.545,-17.919 28.555,-17.919 cw(c28.555,-16.623) 27.639,-17.539
no net on Bottom Layer "NONET_L02_P045" (solid, remove dead copper, pour order 45): 38.346,-29.583 ccw(c37.05,-29.583) 37.966,-28.667 36.663,-27.364 ccw(c35.747,-28.28) 35.747,-26.985 32.307,-26.985 ccw(c32.307,-28.28) 31.391,-27.364 26.179,-32.576 ccw(c27.095,-33.492) 25.8,-33.492 25.8,-39.2 38.346,-39.2
no net on Bottom Layer "NONET_L02_P029" (solid, pour order 29): 0,-25.5 0,-40.5 18.5,-40.5 18.5,-25.5
no net on Bottom Layer "NONET_L02_P024" (solid, pour order 24): 0,-9 0,-24 18.5,-24 18.5,-9
no net on Bottom Layer "NONET_L02_P004" (solid, pour order 4): 0,7.5 0,-7.5 18.5,-7.5 18.5,7.5

## Keep-outs
Keep-Out Layer:
  lines w0: -61,30.5 cw(c-60.5,30.5) -60.5,31
  lines w0.01: -0.25,-40.75 -0.25,7.75 39.5,7.75 39.5,-40.75 -0.25,-40.75

## Other copper
Top Layer:
  rectangle: 15.469,-39.947 17.55,-38.053
  rectangle: 10.033,-37.47 12.319,-36.023
  rectangle: 10.033,-29.977 12.319,-28.53
  rectangle: 15.53,-35.02 16.789,-33.051
  rectangle: 15.469,-23.447 17.55,-21.553
  rectangle: 10.033,-20.97 12.319,-19.523
  rectangle: 10.033,-13.477 12.319,-12.03
  rectangle: 15.53,-18.52 16.789,-16.551
  rectangle net 5V: 15.53,-2.02 16.789,-0.051
  rectangle net DCC2: 10.033,3.023 12.319,4.47
  rectangle net DCC1: 10.033,-4.47 12.319,-3.023
  rectangle net HALL1: 15.469,-6.947 17.55,-5.053
  pour cut-out: 25.8,-13.7 27.258,-13.7 27.258,-13.037
  pour cut-out: 33.588,-11.678 35.991,-11.113 33.883,-10.505

## Silkscreen, mask and mechanical layers (free items; w line width, h text height)
Top Solder:
  region: 23.8,-40.2 23.8,7.3 23.3,7.3 23.3,-40.2
  region: 39.3,-40.2 39.3,1.671 38.8,1.671 38.8,-40.2
  rectangle: 14.396,-39.299 15.268,-37.781
  rectangle: 14.396,-22.799 15.268,-21.281
  rectangle: 14.396,-6.299 15.268,-4.781
Bottom Solder:
  region: 23.8,-40.2 23.8,7.3 23.3,7.3 23.3,-40.2
  region: 39.3,-40.2 39.3,7.3 38.8,7.3 38.8,-40.2
Board Shape:
  lines w0: -61,30.5 cw(c-60.5,30.5) -60.5,31
  lines w0.01: 23.5,-40.5 39.5,-40.5 ; -0.25,-40.75 -0.25,7.75 39.5,7.75 39.5,-40.75 -0.25,-40.75